# Altium PCB PCB1.PcbDoc
Units mil, origin at the board's own origin, x right, y up, seen from the top; angles counter-clockwise.
Board outline 6000 x 4000 mil, 2 copper layers (Top Layer, Bottom Layer); 50 components, 26 nets, 240 pads, 0 vias.
Unrouted connection lines stored in the file: 123.
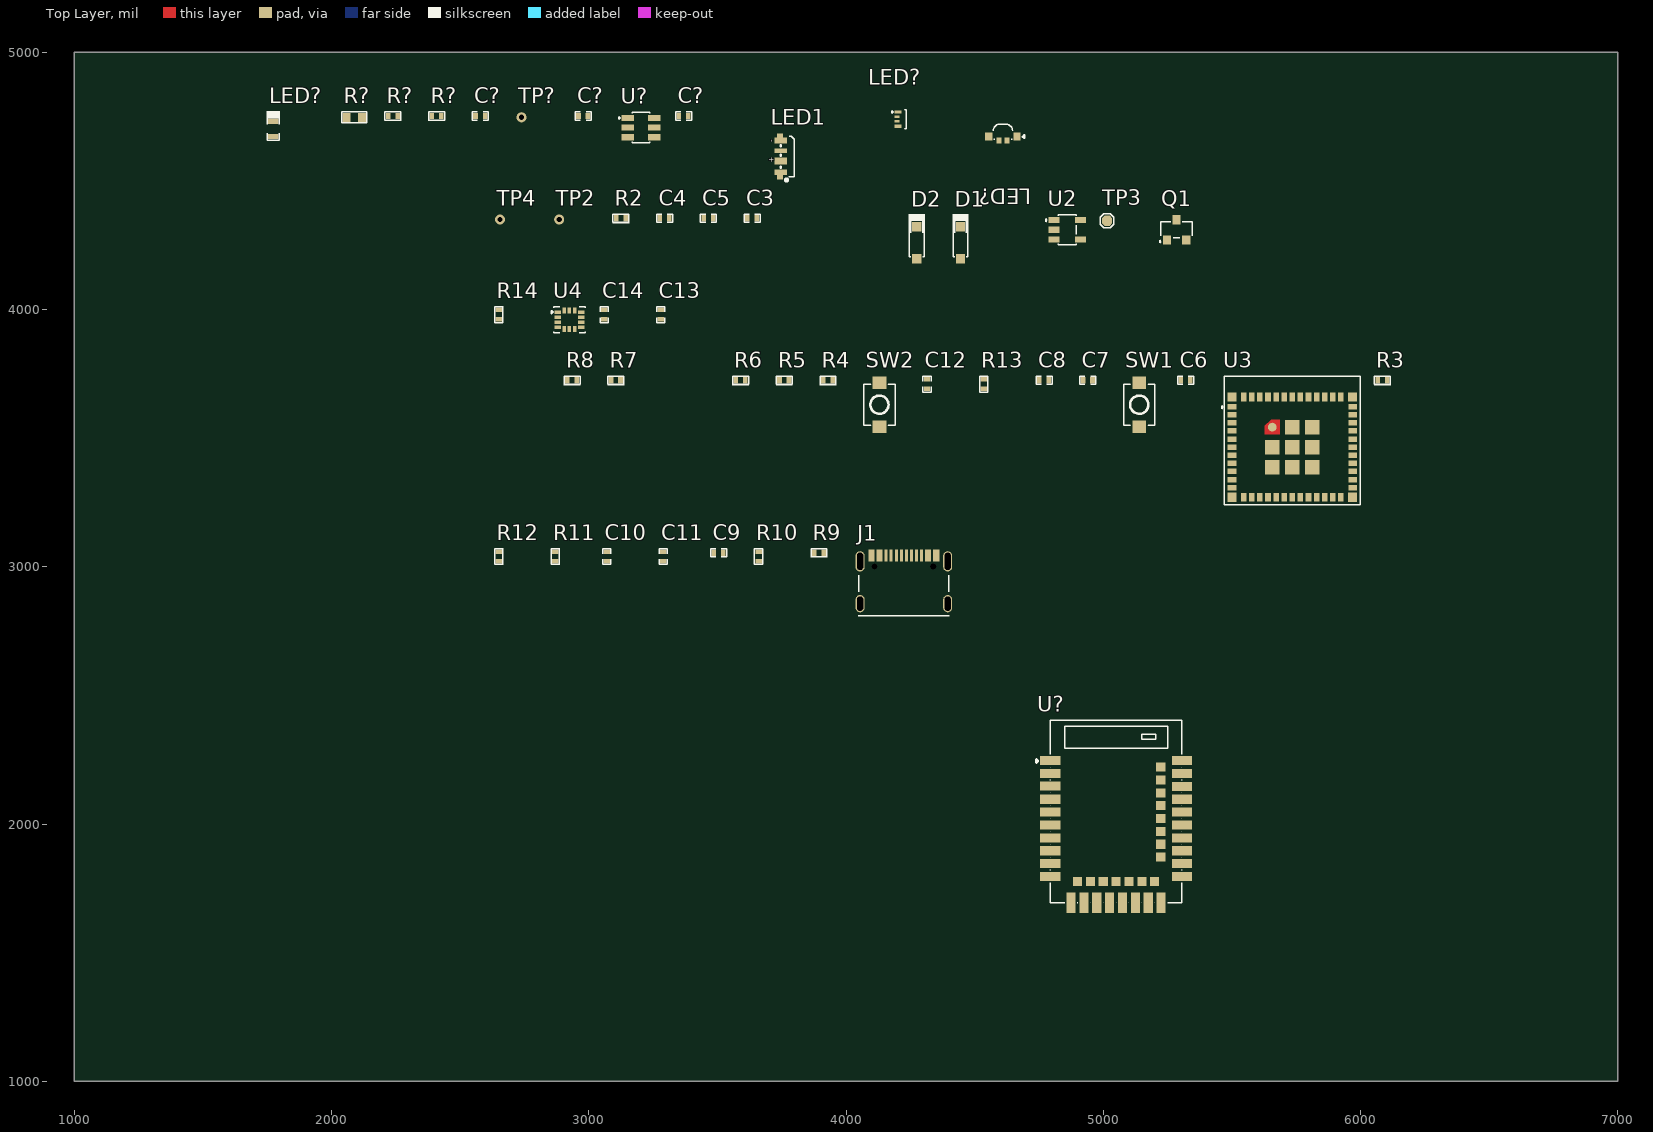
[diagram p0: Top Layer view]
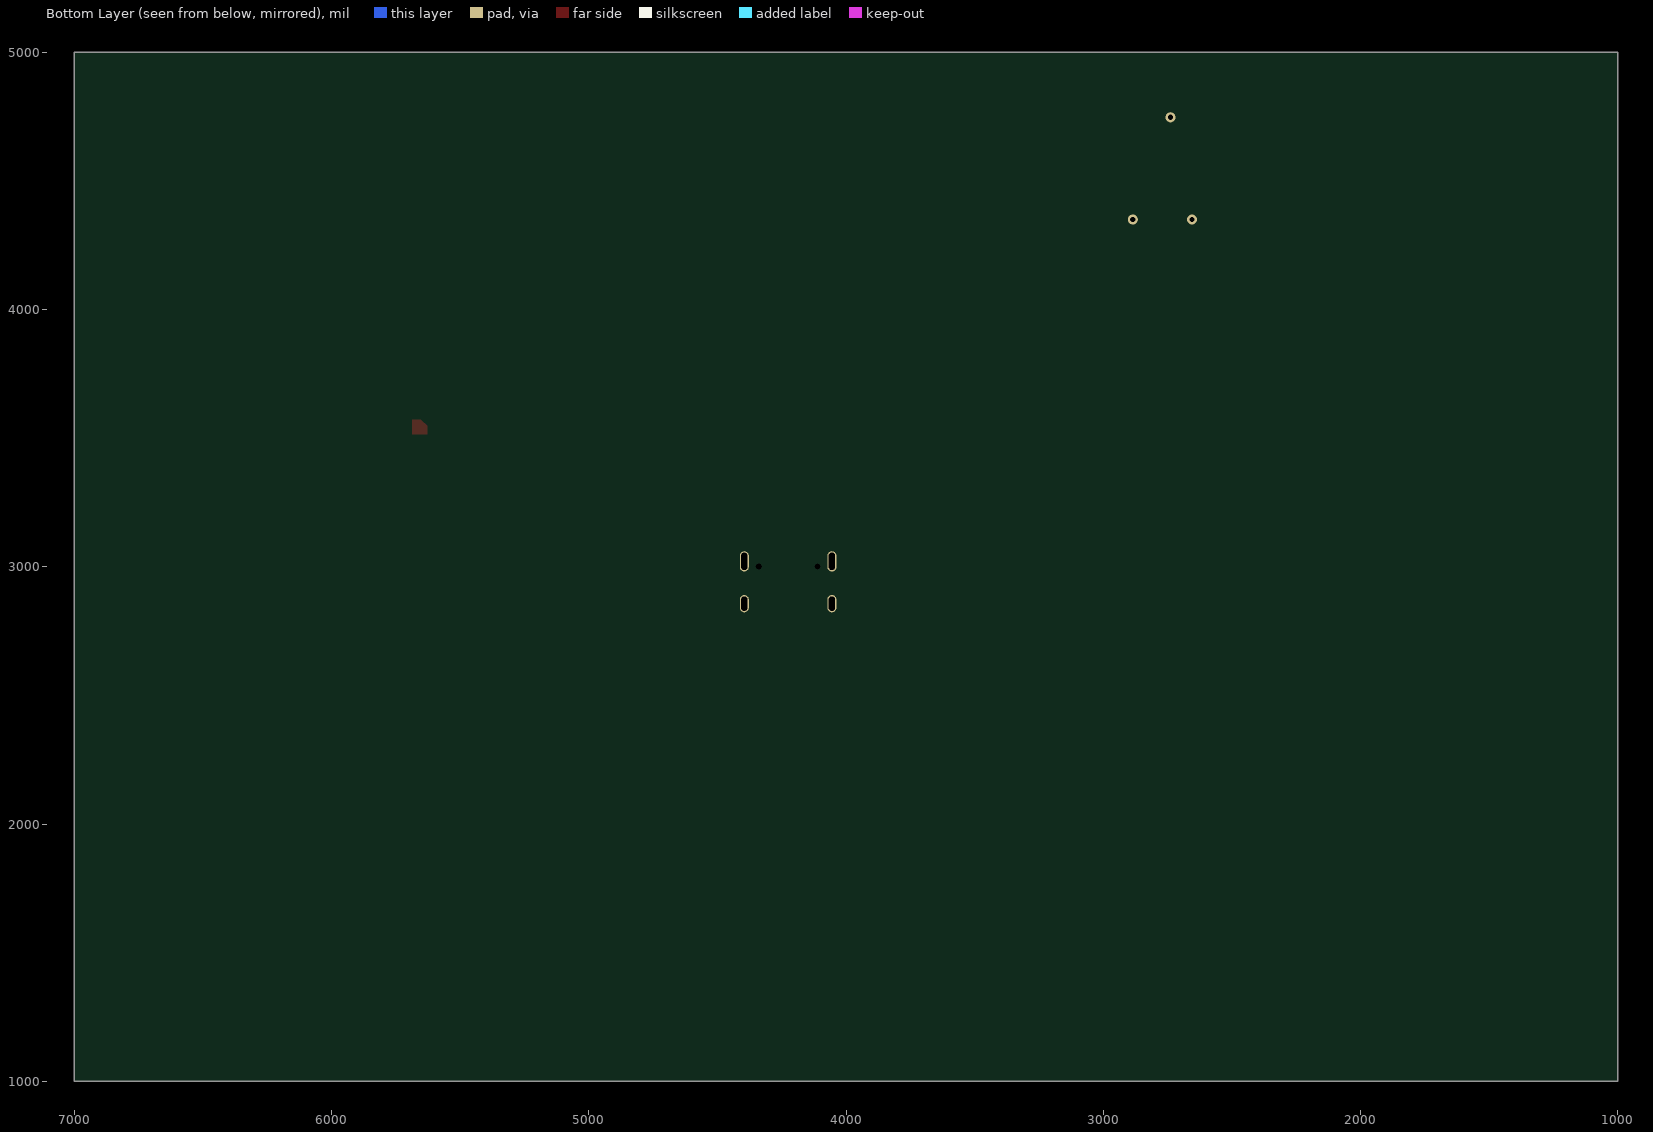
[diagram p1: Bottom Layer view, seen from below]

## Layer stack, top to bottom
Top Solder: solder mask 0.4, Solder Resist, Dk 3.5
Top Layer: signal copper 1.4
Dielectric 1: dielectric 12.6, FR-4, Dk 4.8
Bottom Layer: signal copper 1.4
Bottom Solder: solder mask 0.4, Solder Resist, Dk 3.5

## Board outline
1000,1000 7000,1000 7000,5000 1000,5000

## Design rules (kind name [scope] priority, off if disabled: settings)
Clearance [All] p1: gap=10 ignorepadtopadclearanceinfootprint=FALSE except(0: Arc-Hole Track-Hole SMDPad-Hole THPad-Hole Via-Hole Fill-Hole Poly-Hole Region-Hole Text-Hole)
DiffPairsRouting [All] p1: maxlimit=10 minlimit=10 mostfreqgap=10 toplayer_minwidth=15 toplayer_maxwidth=15 toplayer_prefwidth=15 bottomlayer_minwidth=15 bottomlayer_maxwidth=15 bottomlayer_prefwidth=15 maxuncoupledlength=500
MatchedLengths "Schematic Matched Net Lengths" [InNetClass('USB_PROGRAM')] p1: tolerance=50 checknetsindiffpair=TRUE checkdiffpairvsdiffpair=FALSE checkxsignals=FALSE checkothers=FALSE
MaxMinImpedance "Schematic Impedance Constraint" [InNetClass('USB_PROGRAM')] p1: minimum=85.00 maximum=90.00
PolygonConnect [All] p1: connectstyle=Relief reliefconductorwidth=10 reliefentries=4 polygonreliefangle="90 Angle" airgapwidth=10
RoutingVias [All] p1: holewidth=28 width=50 viastyle="Through Hole" minholewidth=28 minwidth=50 maxholewidth=28 maxwidth=50
SolderMaskExpansion [All] p1: expansion=4 istentingtop=FALSE
Width [All] p1: maxlimit=10 minlimit=10 preferedwidth=10
29 further rules are at their usual default settings.

## Classes and differential pairs
differential pair class USB_PROGRAM_LINES: USB_D
net class USB_PROGRAM: USB_D_N USB_D_P
component class IMU_Sheet: C13 C14 R14 U4
component class Controller_Sheet: C6 C7 C8 C12 LED1 LED? R3 R4 R5 R6 R7 R8 R13 SW1 SW2 U3 U?
component class Connector_Sheet: C9 C10 C11 J1 R9 R10 R11 R12
component class Power_Sheet: C3 C4 C5 C? D1 D2 LED? Q1 R2 R? TP2 TP3 TP4 TP? U2 U?
differential pair USB_D: +USB_D_P -USB_D_N

## Components (designator, comment, footprint, x,y, rotation, side; value= is the part's Value field where it differs from the comment)
C3 "1uF" Cap-0402 3635,4355 r0 top
C4 "1uF" Cap-0402 3295,4355 r0 top
C5 "10uF" Cap-0402 3465,4355 r0 top
C6 "1uF" Cap-0402 5320,3725 r0 top
C7 "100nF" Cap-0402 4940,3725 r0 top
C8 "10uF" Cap-0402 4770,3725 r0 top
C9 "10uF" Cap-0402 3505,3055 r0 top
C10 "22PF" Cap-0402 3070,3040 r90 top value=22pF
C11 "22PF" Cap-0402 3290,3040 r90 top value=22pF
C12 "1uF" Cap-0402 4315,3710 r90 top
C13 "1uF" Cap-0402 3280,3980 r90 top
C14 "100nF" Cap-0402 3060,3980 r90 top
C? "2.2uF" Cap-0402 2578.43,4752.4 r0 top
C? "10uF" Cap-0402 2978.43,4752.4 r0 top
C? "1uF" Cap-0402 3368.43,4752.4 r0 top
D1 "1N5819HW-7-F" SOD-123 4445,4260 r90 top
D2 "1N5819HW-7-F" SOD-123 4275,4260 r90 top
J1 "TYPE-C-31-M-12" TYPE-C-31-M-12_ 4225,2950 r0 top
LED1 "SK6812SIDE-A" SK6812SIDE-A 3745,4595 r90 top
LED? "150060GS75000" LED-0603 1773.43,4702.4 r90 top
LED? "IN-S63TBS5R5G5B" IN-S63TBS5R5G5B 4200,4740 r0 top
LED? "MHS110FRGBCT" MHS110FRGBCT 4610,4665 r0 top
Q1 "SI2301CDS-T1-BE3" SOT-23 5285,4310 r0 top
R2 "100K" Res-0402 3125,4355 r0 top
R3 "10K" Res-0402 6085,3725 r0 top value=10kR
R4 "10K" Res-0402 3930,3725 r0 top value=10kR
R5 "10K" Res-0402 3760,3725 r0 top value=10kR
R6 "10K" Res-0402 3590,3725 r0 top value=10kR
R7 "56K" Res-0402 3105,3725 r0 top
R8 "200K" Res-0402 2935,3725 r0 top
R9 "0R" Res-0402 3895,3055 r0 top
R10 "0R" Res-0402 3660,3040 r90 top
R11 "5.1K" Res-0402 2870,3040 r90 top
R12 "5.1K" Res-0402 2650,3040 r90 top
R13 "10K" Res-0402 4535,3710 r90 top value=10kR
R14 "10K" Res-0402 2650,3980 r90 top value=10kR
R? "100R" Res-0603 2088.43,4747.4 r0 top
R? "21k" Res-0402 2238.43,4752.4 r0 top value=21kR
R? "10K" Res-0402 2408.43,4752.4 r0 top value=10kR
SW1 "TS-1088-AR02016" TS-1088-AR02016 5140,3630 r90 top
SW2 "TS-1088-AR02016" TS-1088-AR02016 4130,3630 r90 top
TP2 "0.5mm Test Pad" "0.5mm Test Pad" 2885,4350 r90 top
TP3 "TEST POINT 0.5mm Dia" "Test-point - 0.5mm" 5015,4345 r90 top
TP4 "0.5mm Test Pad" "0.5mm Test Pad" 2655,4350 r90 top
TP? "0.5mm Test Pad" "0.5mm Test Pad" 2738.43,4747.4 r90 top
U2 "XC6210B332MR" Sot-23-5 4860,4310 r0 top
U3 "ESP32-C3-MINI-1U-H4" ESP32-C3-MINI-1U-H4. 5735,3465 r0 top
U4 "LSM6DSV16XTR" "14-LGA (2.5x3)" 2925,3960 r0 top
U? "E73-2G4M08S1C" E73-2G4M08S1C 5050,1970 r0 top
U? "BQ21040DBVR" SOT-23-6 3203.43,4707.4 r0 top

## Footprints (in the part's own frame and the unit in brackets; to place one, negate y for a bottom-side part, rotate by r counter-clockwise, add the part's x,y. Pads: shape width x height; smd on the part's side, far side on the other; paste and mask are expansions set on the pad)
"0.5mm Test Pad" [mm]
  round 1 hole 0.52: 1(0,0)
"14-LGA (2.5x3)" [mm]
  rect 0.61x0.35 smd mask+0.05: 1(-1.16,0.75) 2(-1.16,0.25) 3(-1.16,-0.25) 4(-1.16,-0.75) 8(1.16,-0.75) 9(1.16,-0.25) 10(1.16,0.25) 11(1.16,0.75)
  rect 0.35x0.61 smd mask+0.05: 5(-0.5,-0.91) 6(0,-0.91) 7(0.5,-0.91) 12(0.5,0.91) 13(0,0.91) 14(-0.5,0.91)
  silkscreen extent -1.78,-1.3 1.55,1.3, body extent -1.5,-1.25 1.5,1.25, height 0.86
Cap-0402 [mil]
  rect 18x25 smd mask+2.36: 1(-18.5,0) 2(18.5,0)
  silkscreen extent -31,-16 31,16, body extent -20,-10 20,10, height 19
E73-2G4M08S1C [mm]
  rect 2x0.9 smd paste+0 mask+0.05: 1(-6.505,7.015) 2(-6.505,5.745) 3(-6.5,4.5) 4(-6.505,3.205) 5(-6.505,1.935) 6(-6.505,0.665) 7(-6.505,-0.605) 8(-6.505,-1.875) 9(-6.505,-3.145) 10(-6.505,-4.415) 26(6.505,-4.415) 27(6.505,-3.145) 29(6.505,-1.875) 31(6.505,-0.605) 33(6.505,0.665) 35(6.505,1.935) 37(6.505,3.205) 39(6.505,4.475) 41(6.505,5.745) 43(6.505,7.015)
  rect 0.9x2 smd paste+0 mask+0.05: 11(-4.445,-7.015) 13(-3.175,-7.015) 15(-1.905,-7.015) 17(-0.635,-7.015) 19(0.635,-7.015) 21(1.905,-7.015) 23(3.175,-7.015) 25(4.445,-7.015)
  rect 0.9x0.9 smd paste+0 mask+0.05: 12(-3.81,-4.915) 14(-2.54,-4.915) 16(-1.27,-4.915) 18(0,-4.915) 20(1.27,-4.915) 22(2.54,-4.915) 24(3.81,-4.915) 28(4.405,-2.51) 30(4.405,-1.24) 32(4.405,0.03) 34(4.405,1.3) 36(4.405,2.57) 38(4.405,3.84) 40(4.405,5.11) 42(4.405,6.38)
  silkscreen extent -7.87,-7 6.5,11, body extent -6.5,-7.01 6.5,10.99, height 3
ESP32-C3-MINI-1U-H4. [mm]
  rect 0.85x0.55 smd paste+0 mask+0.05: 1(-5.95,4) 2(-5.95,3.2) 3(-5.95,2.4) 4(-5.95,1.6) 5(-5.95,0.8) 6(-5.95,0) 7(-5.95,-0.8) 8(-5.95,-1.6) 9(-5.95,-2.4) 10(-5.95,-3.2) 11(-5.95,-4) 25(5.95,-4) 26(5.95,-3.2) 27(5.95,-2.4) 28(5.95,-1.6) 29(5.95,-0.8) 30(5.95,0) 31(5.95,0.8) 32(5.95,1.6) 33(5.95,2.4) 34(5.95,3.2) 35(5.95,4)
  rect 0.55x0.85 smd paste+0 mask+0.05: 12(-4.8,-4.95) 13(-4,-4.95) 14(-3.2,-4.95) 15(-2.4,-4.95) 16(-1.6,-4.95) 17(-0.8,-4.95) 18(0,-4.95) 19(0.8,-4.95) 20(1.6,-4.95) 21(2.4,-4.95) 22(3.2,-4.95) 23(4,-4.95) 24(4.8,-4.95) 36(4.8,4.95) 37(4,4.95) 38(3.2,4.95) 39(2.4,4.95) 40(1.6,4.95) 41(0.8,4.95) 42(0,4.95) 43(-0.8,4.95) 44(-1.6,4.95) 45(-2.4,4.95) 46(-3.2,4.95) 47(-4,4.95) 48(-4.8,4.95)
  rect 1.45x1.45 smd paste+0 mask+0.05: 49(0,0) 54(-1.975,0) 56(0,1.975) 57(1.975,1.975) 58(1.975,0) 59(-1.975,-1.975) 60(0,-1.975) 61(1.975,-1.975)
  rect 0.9x0.9 smd paste+0 mask+0.05: 50(5.95,4.95) 51(5.95,-4.95) 52(-5.95,-4.95) 53(-5.95,4.95)
  round 0.87 smd: 55(-1.975,1.975)
  Top Layer region: -2.7,2.1 -2.1,2.7 -1.25,2.7 -1.25,1.25 -2.7,1.25 -2.7,2.1
  silkscreen extent -6.98,-5.7 6.7,7, body extent -6.6,-5.59 6.6,6.91, height 2.4
IN-S63TBS5R5G5B [mil]
  rect 28x12 smd mask+2.76: 1(1.97,27.56) 4(1.97,-27.56)
  rect 20x10 smd mask+2.76: 2(-1.97,8.86) 3(-1.97,-8.86)
  silkscreen extent -22,-36 35,36
LED-0603 [mm]
  rect 0.5x1 smd: 1(-0.75,0) 2(0.75,0)
  silkscreen extent -1.12,-0.66 1.75,0.66, body extent -0.82,-0.37 0.82,0.36, height 0.68
MHS110FRGBCT [mm]
  rect 0.7x0.8 smd: 1(1.4,0.2) 4(-1.4,0.2)
  rect 0.5x0.55 smd: 2(0.4,-0.2) 3(-0.4,-0.2)
  silkscreen extent -0.97,-0.1 2.11,1.43, body extent -1.6,-0.05 1.6,1.44, height 1.01
Res-0402 [mil]
  rect 18x25 smd mask+2.17: 1(-18.5,0) 2(18.5,0)
  silkscreen extent -32,-17 32,16, body extent -23,-11 23,11, height 16
Res-0603 [mil]
  rect 30x35 smd: 1(-30,0) 2(30,0)
  silkscreen extent -48,-21 48,21, body extent -31,-17 31,17, height 18
SK6812SIDE-A [mm] "SMD-4P,1.6x4mm Light Emitting Diodes (LED) ROHS"
  rect 0.45x0.55 smd: 1(-2.06,0.038) 4(2.06,0.038)
  rect 0.55x1.2 smd: 1(-1.575,-0.038) 4(1.575,-0.038)
  rect 0.7x1.2 smd: 2(-0.45,-0.038)
  rect 0.45x1.2 smd: 3(0.575,-0.038)
  silkscreen extent -2.46,-1.38 2,-0.04, body extent -2.04,-1.34 1.96,0.26, height 2
SOD-123 [mm]
  rect 0.95x0.9 smd: 1(-1.575,0) 2(1.575,0)
  silkscreen extent -1.37,-0.8 2.82,0.8, body extent -1.82,-0.78 1.83,0.78, height 1.5
SOT-23 [mm] "TRANS NPN 40V 0.6A SOT23"
  rect 0.82x0.92 smd: 1(-0.95,-1) 2(0.95,-1) 3(0,1)
  silkscreen extent -1.68,-1.3 1.55,0.81, body extent -1.5,-1.25 1.5,1.25, height 1.05
Sot-23-5 [mm]
  rect 1.1x0.6 smd: 1(-1.3,0.95) 2(-1.3,0) 3(-1.3,-0.95) 4(1.3,-0.95) 5(1.3,0.95)
  silkscreen extent -2.13,-1.5 0.88,1.5, body extent -1.4,-1.45 1.4,1.45, height 1.45
SOT-23-6 [mm]
  rect 1.22x0.62 smd: 1(-1.31,0.95) 2(-1.31,0) 3(-1.31,-0.95) 4(1.31,-0.95) 5(1.31,0) 6(1.31,0.95)
  silkscreen extent -2.18,-1.52 0.86,1.52, body extent -1.5,-1.5 1.5,1.5, height 1.47
"Test-point - 0.5mm" [mm]
  oct 1x1 smd: 1(0,0)
  silkscreen extent -0.68,-0.68 0.68,0.68
TS-1088-AR02016 [mm]
  rect 1.23x1.36 smd: 1(-2.185,0) 2(2.185,0)
  silkscreen extent -2.03,-1.54 2.03,1.54, body extent -2.4,-1.45 2.4,1.45, height 1.95
TYPE-C-31-M-12_ [mm]
  rect 0.6x1.2 smd: A1/B12(-3.2,2.375) A4/B9(-2.4,2.375) B1/A12(3.2,2.375) B4/A9(2.4,2.375)
  rect 0.3x1.2 smd: A5(-1.25,2.375) A6(-0.25,2.375) A7(0.25,2.375) A8(1.25,2.375) B5(1.75,2.375) B6(0.75,2.375) B7(-0.75,2.375) B8(-1.75,2.375)
  round 0 hole 0.62 unplated: MH(-2.89,1.305) MH(2.89,1.305)
  oval 0.9x2 hole 0.6 slot 1.7 at 90 deg: S1(4.325,1.805) S4(-4.325,1.805)
  oval 0.9x1.7 hole 0.6 slot 1.4 at 90 deg: S2(4.325,-2.375) S3(-4.325,-2.375)
  silkscreen extent -4.5,-3.57 4.5,0.44, body extent -4.47,-5.01 4.47,2.89, height 3.31

## Part data
C3 C4 C6 C12 C13 C?: library part GRM155C71C105KE11D, "CAP CER 1UF 16V X7S 0402", Case/Package=343Case, Dielectric=1542DielectricType, LCSC Part Number=C576449, Manufacturer=Murata, Max Operating Temperature=125°C, Min Operating Temperature=-55°C, Tolerance=10%, Voltage Rating=16V, Height=600um, Item Type=Capacitors, Length=1mm, Manufacturer Part Number=GRM155C71C105KE11D, Material=4241ConductorMaterial, Pricing="1=0.11, 10=0.041, 50=0.041, 100=0.026, 1000=0.023, 10000=0.016 (USD)", RoHS=No, Stock=16102, Supplier=Mouser, Thickness=500um, Voltage Rating (DC)=16V, Width=500um
C5 C8 C9 C?: library part CL05A106MP5NUNC, "CAP CER 10UF 10V X5R 0402", Case Code (Imperial)=0402, Case Code (Metric)=1005, Dielectric=X5R, LCSC Part Number=C315248, Manufacturer=Samsung, Max Operating Temperature=85°C, Min Operating Temperature=-55°C, Package Quantity=1, Tolerance=20%, Voltage Rating=10V, Capacitance=10uF, Case/Package=0402, Category="Ceramic Capacitors", ComponentLink1Description=https://datasheet.ciiva.com/25721/cl05a106mp5nunc-25721584.pdf?src-supplier=Digi-Key, ComponentLink1URL=https://datasheet.ciiva.com/25721/cl05a106mp5nunc-25721584.pdf?src-supplier=Digi-Key, ComponentLink2Description=https://datasheet.ciiva.com/26838/getdatasheetpartid-745310-26838170.pdf?src-supplier=Verical, ComponentLink2URL=https://datasheet.ciiva.com/26838/getdatasheetpartid-745310-26838170.pdf?src-supplier=Verical, Construction=Flat, Contact Plating=Tin, Depth=0.5mm, Item Type=Capacitor, Lead Free="Lead Free", Length=1mm, Manufacturer Part Number=CL05A106MP5NUNC, Mount="Surface Mount", Packaging="Tape and Reel", Pricing 1="10000=0.02537 (USD)", Radiation Hardening=No, RoHS=Yes, RoHS Compliant=Yes, Series=CL, Stock 1=1729850, Supplier 1=Avnet, Supplier Part Number 1=CL05A106MP5NUNC, Termination=Wraparound, Thickness=0.028inch, Width=0.02inch
C7 C14: library part CC0402KRX5R8BB104, "CAP CER 0.1UF 25V X5R 0402", Case Code (Imperial)=0402, Case Code (Metric)=1005, Dielectric=X5R, LCSC Part Number=C106256, Manufacturer=Yageo, Max Operating Temperature=85°C, Min Operating Temperature=-55°C, Resistor Type=Ceramic, Supplier Part Number 1=311-1697-1-ND, Tolerance=10%, Voltage Rating=25V, Capacitance=100nF, Case/Package=0402, Category="Ceramic Capacitors", ComponentLink1Description=http://www.mouser.com/ds/2/447/UPY-GPHC_X5R_4V-to-50V_25-1131599.pdf?src-supplier=Mouser, ComponentLink1URL=http://www.mouser.com/ds/2/447/UPY-GPHC_X5R_4V-to-50V_25-1131599.pdf?src-supplier=Mouser, ComponentLink2Description=http://www.yageo.com/documents/recent/UPY-GPHC_X5R_4V-to-50V-16.pdf?src-supplier=Future+Electronics, ComponentLink2URL=http://www.yageo.com/documents/recent/UPY-GPHC_X5R_4V-to-50V-16.pdf?src-supplier=Future+Electronics, ComponentLink3Description=http://www.yageo.com/documents/recent/UPY-GPHC_X5R_4V-to-50V_25.pdf?src-supplier=Digi-Key, ComponentLink3URL=http://www.yageo.com/documents/recent/UPY-GPHC_X5R_4V-to-50V_25.pdf?src-supplier=Digi-Key, Depth=0.5mm, Halogen Free="Halogen Free", Item Type=Capacitor, Lead Free="Lead Free", Length=0.039inch, Manufacturer Part Number=CC0402KRX5R8BB104, Mount="Surface Mount", Packaging="Tape and Reel", Pricing 1="1=0.10000, 10=0.03800, 50=0.02100, 100=0.01710, 500=0.01224, 1000=0.00961, 2500=0.00874, 5000=0.00804 (USD)", RoHS=Yes, RoHS Compliant=Yes, Series=CC, Stock 1=4598218, Supplier 1=Digi-Key, Thickness=0.022inch, Voltage Rating (DC)=25V, Width=0.02inch
C10 C11: library part CC0402JRNPO9BN220, "CAP CER 22PF 50V C0G/NPO 0402", Case Code (Imperial)=0402, Case Code (Metric)=1005, Dielectric=C0G, Dielectric Material=Ceramic, Insulation Resistance=100GR, LCSC Part Number=C106203, Manufacturer=Yageo, Max Operating Temperature=125°C, Min Operating Temperature=-55°C, Package Quantity=1, Supplier Part Number 1=9105957, Temperature Coefficient=30ppm/°C, Tolerance=5%, Voltage=50V, Case/Package=0402, Category="Ceramic Capacitors", ComponentLink1Description=https://datasheet.ciiva.com/5789/1443161-5789509.pdf?src-supplier=Farnell, ComponentLink1URL=https://datasheet.ciiva.com/5789/1443161-5789509.pdf?src-supplier=Farnell, ComponentLink2Description=https://datasheet.ciiva.com/8033/1443161-8033606.pdf?src-supplier=Element14, ComponentLink2URL=https://datasheet.ciiva.com/8033/1443161-8033606.pdf?src-supplier=Element14, ComponentLink3Description=https://datasheet.ciiva.com/7656/1132289-7656615.pdf?src-supplier=Element14, ComponentLink3URL=https://datasheet.ciiva.com/7656/1132289-7656615.pdf?src-supplier=Element14, ComponentLink4Description=https://datasheet.ciiva.com/8033/1443161-8033607.pdf?src-supplier=Element14, ComponentLink4URL=https://datasheet.ciiva.com/8033/1443161-8033607.pdf?src-supplier=Element14, ComponentLink5Description=https://datasheet.ciiva.com/8033/1443161-8033605.pdf?src-supplier=Element14, ComponentLink5URL=https://datasheet.ciiva.com/8033/1443161-8033605.pdf?src-supplier=Element14, ComponentLink6Description=https://datasheet.ciiva.com/143/mlccorderingcode-143987.pdf?src-supplier=Digi-Key, ComponentLink6URL=https://datasheet.ciiva.com/143/mlccorderingcode-143987.pdf?src-supplier=Digi-Key, ComponentLink7Description=https://datasheet.ciiva.com/143/mlccorderingcode-143986.pdf?src-supplier=Digi-Key, ComponentLink7URL=https://datasheet.ciiva.com/143/mlccorderingcode-143986.pdf?src-supplier=Digi-Key, ComponentLink8Description=https://datasheet.ciiva.com/143/mlccorderingcode-143988.pdf?src-supplier=Digi-Key, ComponentLink8URL=https://datasheet.ciiva.com/143/mlccorderingcode-143988.pdf?src-supplier=Digi-Key, ComponentLink9Description=https://datasheet.ciiva.com/5425/upy-gp-np0-16v-to-50v-8-5425483.pdf?src-supplier=Mouser, ComponentLink9URL=https://datasheet.ciiva.com/5425/upy-gp-np0-16v-to-50v-8-5425483.pdf?src-supplier=Mouser, ComponentLink10Description=https://datasheet.ciiva.com/15189/getdatasheetpartid-370074-15189117.pdf?src-supplier=Verical, ComponentLink10URL=https://datasheet.ciiva.com/15189/getdatasheetpartid-370074-15189117.pdf?src-supplier=Verical, Depth=0.5mm, Height=0.5mm, Item Type=Capacitor, Lead Free="Lead Free", Length=1mm, Manufacturer Part Number=CC0402JRNPO9BN220, Mounting Technology="Surface Mount", Packaging="Tape and Reel", Pins=2, Pricing 1="10000=0.00220, 40000=0.00210, 150000=0.00200, 400000=0.00190, 1000000=0.00180 (USD)", Radiation Hardening=No, Reach SVHC Compliant=Yes, Resistor Type=Ceramic, RoHS=Yes, RoHS Compliant=Yes, Series=CC, Stock 1=200000, Supplier 1="Future Electronics", Termination=SMD/SMT, Thickness=0.022inch, Voltage Rating=50V, Voltage Rating (DC)=50V, Width=0.02inch
C?: library part GRM155R61C225KE11D, "CAP CER 2.2UF 16V X5R 0402", Case Code (Imperial)=0402, Case Code (Metric)=1005, LCSC Part Number=C88944, Manufacturer=Murata, Max Operating Temperature=85°C, Min Operating Temperature=-55°C, Tolerance=10%, Voltage Rating=16V, Case/Package=0402, ComponentLink1Description=http://www.mouser.com/ds/2/281/c02e-2905.pdf?src-supplier=Mouser, ComponentLink1URL=http://www.mouser.com/ds/2/281/c02e-2905.pdf?src-supplier=Mouser, ComponentLink2Description=https://datasheet.octopart.com/GRM155R61C225KE11D-Murata-datasheet-149522998.pdf?src-supplier=Newark, ComponentLink2URL=https://datasheet.octopart.com/GRM155R61C225KE11D-Murata-datasheet-149522998.pdf?src-supplier=Newark, ComponentLink3Description=https://datasheet.octopart.com/GRM155R61C225KE11D-Murata-datasheet-66001083.pdf?src-supplier=Future+Electronics, ComponentLink3URL=https://datasheet.octopart.com/GRM155R61C225KE11D-Murata-datasheet-66001083.pdf?src-supplier=Future+Electronics, ComponentLink4Description=https://search.murata.co.jp/Ceramy/image/img/A01X/G101/ENG/GRM155R61C225KE11-01.pdf?src-supplier=Digikey, ComponentLink4URL=https://search.murata.co.jp/Ceramy/image/img/A01X/G101/ENG/GRM155R61C225KE11-01.pdf?src-supplier=Digikey, ComponentLink5Description=https://datasheet.octopart.com/GRM155R61C225KE11D-Murata-datasheet-165579666.pdf?src-supplier=TME, ComponentLink5URL=https://datasheet.octopart.com/GRM155R61C225KE11D-Murata-datasheet-165579666.pdf?src-supplier=TME, Height=0.3mm, Item Type=Capacitors, Lead Free="Lead Free", Length=0.039inch, Manufacturer Part Number=GRM155R61C225KE11D, Material=Ceramic, Mounting Technology="Surface Mount", Packaging="Cut Tape", Pricing="10000=0.0294, 20000=0.0289, 30000=0.0287, 40000=0.0285, 50000=0.0279 (USD)", RoHS=Yes, RoHS Compliant=Yes, Series=GRM, Stock=80000, Supplier="Future Electronics", Thickness=0.022inch, Voltage Rating (DC)=16V, Width=0.02inch
D1 D2: "DIODE SCHOTTKY 40V 1A SOD123", Average Rectified Current=1A, Capacitance=110pF, Case/Package=SOD-123-2, Forward Voltage=450mV, LCSC Part Number=C82544, Manufacturer=Diodes, Max Forward Surge Current (Ifsm)=25A, Max Operating Temperature=125°C, Max Power Dissipation=450mW, Max Repetitive Reverse Voltage (Vrrm)=40V, Max Reverse Current=50uA, Min Operating Temperature=-65°C, Package Quantity=3000, Supplier Part Number 1=1N5819HW-FDICT-ND, Category="Schottky Diodes", ComponentLink1Description=https://datasheet.ciiva.com/16303/ds30217-16303296.pdf?src-supplier=Future+Electronics, ComponentLink1URL=https://datasheet.ciiva.com/16303/ds30217-16303296.pdf?src-supplier=Future+Electronics, ComponentLink2Description=https://datasheet.ciiva.com/27092/1538419-27092484.pdf?src-supplier=Jameco, ComponentLink2URL=https://datasheet.ciiva.com/27092/1538419-27092484.pdf?src-supplier=Jameco, ComponentLink3Description=https://datasheet.ciiva.com/912/ds30217-912801.pdf?src-supplier=Digi-Key, ComponentLink3URL=https://datasheet.ciiva.com/912/ds30217-912801.pdf?src-supplier=Digi-Key, ComponentLink4Description=https://datasheet.ciiva.com/1177/ds30217-1177089.pdf?src-supplier=Element14, ComponentLink4URL=https://datasheet.ciiva.com/1177/ds30217-1177089.pdf?src-supplier=Element14, ComponentLink5Description=https://datasheet.ciiva.com/912/ds30217-912802.pdf?src-supplier=Digi-Key, ComponentLink5URL=https://datasheet.ciiva.com/912/ds30217-912802.pdf?src-supplier=Digi-Key, ComponentLink6Description=https://datasheet.ciiva.com/912/ds30217-912803.pdf?src-supplier=Digi-Key, ComponentLink6URL=https://datasheet.ciiva.com/912/ds30217-912803.pdf?src-supplier=Digi-Key, ComponentLink7Description=https://datasheet.ciiva.com/8303/ds30217-8303132.pdf?src-supplier=Avnet, ComponentLink7URL=https://datasheet.ciiva.com/8303/ds30217-8303132.pdf?src-supplier=Avnet, ComponentLink8Description=https://datasheet.ciiva.com/25919/ds30217-25919644.pdf?src-supplier=Avnet+Europe, ComponentLink8URL=https://datasheet.ciiva.com/25919/ds30217-25919644.pdf?src-supplier=Avnet+Europe, Contact Plating=Tin,Matte, Current Rating=1A, Element Configuration=Single, Forward Current=1A, Height=1.25mm, Item Type=Diode, Lead Free="Lead Free", Length=2.85mm, Manufacturer Part Number=1N5819HW-7-F, Max Reverse Voltage (DC)=40V, Number of Pins=2, Output Current=1A, Packaging="Tape and Reel", Peak Non-Repetitive Surge Current=25A, Polarity=Standard, Pricing 1="1=0.46000, 10=0.34500, 100=0.19530, 500=0.12936, 1000=0.09918 (USD)", Radiation Hardening=No, REACH SVHC="No SVHC", RoHS=Yes, RoHS Compliant=Yes, Series=-, Supplier 1=Digi-Key, Termination=SMD/SMT, Voltage Rating (DC)=40V, Weight=0.000353oz, Width=1.7mm
J1: "5A 1 16P Female Type-C SMD USB Connectors ROHS", LCSC Part Number=C165948, Manufacturer="Korean Hroparts Elec", ComponentLink1Description=LCSC, ComponentLink1URL=https://www.lcsc.com/product-detail/USB-Connectors_Korean-Hroparts-Elec-TYPE-C-31-M-12_C165948.html, Item Type="USB Connector", Manufacturer Part Number=TYPE-C-31-M-12
LED1: "SMD-4P,1.6x4mm Light Emitting Diodes (LED) ROHS", LCSC Part Number=C5378721, Manufacturer="OPSCO Optoelectronics", Package=SMD-4P,1.6x4mm, ComponentLink1Description=LCSC, ComponentLink1URL=https://www.lcsc.com/product-detail/Light-Emitting-Diodes-LED_OPSCO-Optoelectronics-SK6812SIDE-A_C5378721.html, Item Type="Addressable RGB LED", Manufacturer Part Number=SK6812SIDE-A
LED?: "LED GREEN CLEAR 0603 SMD", Case Code (Imperial)=0603, Case Code (Metric)=1608, Color=Green, Forward Current=30mA, Forward Voltage=3.2V, LCSC Part Number=C5252984, Lens Color=Colorless, Manufacturer="Wurth Electronics", Max Operating Temperature=85°C, Max Reverse Voltage (DC)=5V, Min Operating Temperature=-40°C, Output Current=10uA, Package Quantity=1, Power Dissipation=105mW, Test Current=20mA, Case/Package=0603, ComponentLink1Description=https://datasheet.ciiva.com/29562/150060gs75000-29562868.pdf?src-supplier=Digikey, ComponentLink1URL=https://datasheet.ciiva.com/29562/150060gs75000-29562868.pdf?src-supplier=Digikey, ComponentLink2Description=https://datasheet.ciiva.com/29279/759427-da-01-en-chipled-0603-w-kl-gruen-150060gs75000-29279201.pdf?src-supplier=Conrad, ComponentLink2URL=https://datasheet.ciiva.com/29279/759427-da-01-en-chipled-0603-w-kl-gruen-150060gs75000-29279201.pdf?src-supplier=Conrad, ComponentLink3Description=https://datasheet.ciiva.com/29562/150060gs75000-29562869.pdf?src-supplier=Digikey, ComponentLink3URL=https://datasheet.ciiva.com/29562/150060gs75000-29562869.pdf?src-supplier=Digikey, ComponentLink4Description=https://datasheet.ciiva.com/29562/150060gs75000-29562870.pdf?src-supplier=Digikey, ComponentLink4URL=https://datasheet.ciiva.com/29562/150060gs75000-29562870.pdf?src-supplier=Digikey, Dominant Wavelength=520nm, Height=0.8mm, Item Type=LEDs, Lead Free="Lead Free", Length=1.6mm, Lens Size=0.7mm, Lens Style=Clear,Flat,Rectangular, Lens Transparency=Clear, Luminous Intensity=430mcd, Manufacturer Part Number=150060GS75000, Mounting Technology="Surface Mount", Packaging="Cut Tape", Reach SVHC Compliant=Unknown, Reverse Voltage=5V, RoHS=Yes, RoHS Compliant=Yes, Series=WL-SMCW, Stock=14000, Supplier=Rs, Viewing Angle=140°, Wavelength=520nm, Width=0.8mm
LED?: "LED RGB CLEAR 0603 SMD R/A", Manufacturer=Inolux, Supplier Part Number=743-IN-S63TBS5R5G5B, Category=LEDs, Item Type=LED, Manufacturer Part Number=IN-S63TBS5R5G5B, Pricing="1=0.5, 10=0.328, 50=0.328, 100=0.218, 1000=0.152, 10000=0.141 (USD)", RoHS=No, Stock=12751, Supplier=Mouser
LED?: "Colorless transparence Side stickers -40℃~+85℃ Common anode RGB 120° 60mW SMD,1.5x3.2mm Light Emitting Diodes (LED) ROHS", LCSC Part Number=C496820, Manufacturer=MEIHUA, Package=SMD,1.5x3.2mm, ComponentLink1Description=LCSC, ComponentLink1URL=https://www.lcsc.com/product-detail/Light-Emitting-Diodes-LED_MEIHUA-MHS110FRGBCT_C496820.html, Item Type="RGB LED", Manufacturer Part Number=MHS110FRGBCT
Q1: "Transistor MOSFET P-CH 20V 3.1A 3-Pin SOT-23", Continuous Drain Current (ID)=-2.3A, Drain to Source Breakdown Voltage=-20V, Drain to Source Resistance=90mR, Gate to Source Voltage (Vgs)=8V, Manufacturer=Vishay, Max Operating Temperature=150°C, Min Operating Temperature=-55°C, Power Dissipation=860mW, Supplier Part Number=742-SI2301CDS-T1-BE3CT-ND, Category=MOSFETs, Drain to Source Voltage (Vdss)=-20V, Height=1.12mm, Manufacturer Part Number=SI2301CDS-T1-BE3, Number of Channels=1NUMBER, Pricing="1=0.37, 10=0.289, 100=0.1734, 500=0.1606, 1000=0.1092 (USD)", RoHS=Yes, Stock=6842, Supplier=Digikey, Turn-Off Delay Time=30ns, Turn-On Delay Time=11ns
R2: library part RC0402FR-07100KL, "RES 100K OHM 1% 1/16W 0402", Case Code (Imperial)=0402, Case Code (Metric)=1005, LCSC Part Number=C60491, Manufacturer=Yageo, Max Operating Temperature=155°C, Max Power Dissipation=63mW, Min Operating Temperature=-55°C, Package Quantity=1, Resistance=100kR, Resistance Tolerance=1%, Resistor Type="Thick Film", Supplier Part Number 1=603-RC0402FR-07100KL, Temperature Coefficient=100ppm/°C, Voltage Rating=50V, Case/Package=0402, Category="Chip SMD Resistors", ComponentLink1Description=https://datasheet.ciiva.com/11819/0900766b80c66297-11819452.pdf?src-supplier=RSComponents, ComponentLink1URL=https://datasheet.ciiva.com/11819/0900766b80c66297-11819452.pdf?src-supplier=RSComponents, ComponentLink2Description=https://datasheet.ciiva.com/22747/1018594-22747509.pdf?src-supplier=Element14, ComponentLink2URL=https://datasheet.ciiva.com/22747/1018594-22747509.pdf?src-supplier=Element14, ComponentLink3Description=https://datasheet.ciiva.com/2453/pyu-r-int-thick-7-2453362.pdf?src-supplier=Digi-Key, ComponentLink3URL=https://datasheet.ciiva.com/2453/pyu-r-int-thick-7-2453362.pdf?src-supplier=Digi-Key, ComponentLink4Description=https://datasheet.ciiva.com/2453/pyu-r-int-thick-7-2453363.pdf?src-supplier=Digi-Key, ComponentLink4URL=https://datasheet.ciiva.com/2453/pyu-r-int-thick-7-2453363.pdf?src-supplier=Digi-Key, ComponentLink5Description=https://datasheet.ciiva.com/2453/pyu-r-int-thick-7-2453361.pdf?src-supplier=Digi-Key, ComponentLink5URL=https://datasheet.ciiva.com/2453/pyu-r-int-thick-7-2453361.pdf?src-supplier=Digi-Key, ComponentLink6Description=https://datasheet.ciiva.com/12667/pyu-rc0402-51-rohs-l-6-r-12667930.pdf?src-supplier=Mouser, ComponentLink6URL=https://datasheet.ciiva.com/12667/pyu-rc0402-51-rohs-l-6-r-12667930.pdf?src-supplier=Mouser, ComponentLink7Description=https://datasheet.ciiva.com/15189/getdatasheetpartid-323696-15189334.pdf?src-supplier=Verical, ComponentLink7URL=https://datasheet.ciiva.com/15189/getdatasheetpartid-323696-15189334.pdf?src-supplier=Verical, Construction=Rectangular, Depth=0.5mm, Features="Moisture Resistant", Height=0.016inch, Item Type=Resistor, Lead Free="Lead Free", Length=0.039inch, Manufacturer Part Number=RC0402FR-07100KL, Military Standard=Not, Number of Terminations=2, Packaging="Tape and Reel", Power Rating=63mW, Pricing 1="1=0.10000, 10=0.01200, 50=0.01200, 100=0.00500, 1000=0.00300, 2500=0.00200, 10000=0.00100 (USD)", REACH SVHC="No SVHC", RoHS=Yes, RoHS Compliant=Yes, Series=RC, Stock 1=7759549, Supplier 1=Mouser, Technology="THICK FILM", Termination=SMD/SMT, Tolerance=1%, Width=0.02inch, Working Voltage=50V
R3 R4 R5 R6 R13 R14 R?: library part RE0402DRE0710KL, "RES SMD 10K OHM 0.5% 1/16W 0402", Case/Package=0402, LCSC Part Number=C851874, Manufacturer=Yageo, Max Operating Temperature=155°C, Max Power Dissipation=63mW, Min Operating Temperature=-55°C, Supplier Part Number=8132697, Temperature Coefficient=50ppm/°C, Tolerance=0.5%, Category="Chip SMD Resistors", ComponentLink1Description=http://www.yageo.com/NewPortal/yageodocoutput?fileName=/pdf/R-Chip/PYu-RE_105_RoHS_L_6.pdf&src-supplier=Digi-Key, ComponentLink1URL=http://www.yageo.com/NewPortal/yageodocoutput?fileName=/pdf/R-Chip/PYu-RE_105_RoHS_L_6.pdf&src-supplier=Digi-Key, Features="Moisture Resistant", Height=0.015inch, Item Type=Resistor, Length=0.039inch, Manufacturer Part Number=RE0402DRE0710KL, Number of Terminations=2, Packaging="Tape and Reel", Pricing="10000=0.0059, 40000=0.0056, 150000=0.0053, 250000=0.0052, 500000=0.0049 (USD)", RoHS=Yes, RoHS Compliant=Yes, Series=RE, Stock=10000, Supplier="Future Electronics", Width=0.02inch
R7: library part RT0402BRD0756KL, "RES SMD 56K OHM 0.1% 1/16W 0402", LCSC Part Number=C852845, Manufacturer=Yageo, ComponentLink1Description=https://datasheet.ciiva.com/12721/pyu-rt-1-to-0-05-rohs-l-4-12721243.pdf?src-supplier=Mouser, ComponentLink1URL=https://datasheet.ciiva.com/12721/pyu-rt-1-to-0-05-rohs-l-4-12721243.pdf?src-supplier=Mouser, ComponentLink2Description=https://datasheet.ciiva.com/2582/pyu-rt-1-to-0-05-rohs-l-4-2582430.pdf?src-supplier=Digikey, ComponentLink2URL=https://datasheet.ciiva.com/2582/pyu-rt-1-to-0-05-rohs-l-4-2582430.pdf?src-supplier=Digikey, Item Type=Resistors, Manufacturer Part Number=RT0402BRD0756KL, Pricing="10000=0.0279 (USD)", RoHS=Yes, Stock=70000, Supplier="Arrow Electronics"
R8: library part RC0402DR-07200KL, "RES 200K OHM 0.5% 1/16W 0402", Case/Package=0402, LCSC Part Number=C138077, Manufacturer=Yageo, Max Operating Temperature=155°C, Max Power Dissipation=63mW, Min Operating Temperature=-55°C, Resistance=200kR, Resistor Type="Thick Film", Supplier Part Number 1=603-RC0402DR-07200KL, Temperature Coefficient=100ppm/°C, Tolerance=0.5%, Category="Chip SMD Resistors", ComponentLink1Description=http://www.yageo.com.tw/exep/pages/download/literatures/PYu-R_INT-thick_7.pdf?src-supplier=Digi-Key, ComponentLink1URL=http://www.yageo.com.tw/exep/pages/download/literatures/PYu-R_INT-thick_7.pdf?src-supplier=Digi-Key, Features="Moisture Resistant", Height=0.016inch, Length=0.039inch, Manufacturer Part Number=RC0402DR-07200KL, Number of Terminations=2, Packaging="Tape and Reel", Pricing 1="1=0.13000, 10=0.07000, 50=0.07000, 100=0.02900, 1000=0.01300, 10000=0.00700 (USD)", RoHS=Yes, Supplier 1=Mouser, Width=0.02inch
R9 R10: library part RCS04020000Z0ED, "RES SMD 0 OHM JUMPER 1/5W 0402", Case Code (Imperial)=0402, Case Code (Metric)=1005, LCSC Part Number=C844673, Manufacturer="Vishay Dale", Max Operating Temperature=155°C, Max Power Dissipation=200mW, Min Operating Temperature=-55°C, Resistance=0mR, Resistor Type="Thick Film", Supplier Part Number 1=541-2877-1-ND, Case/Package=0402, ComponentLink1Description=http://www.farnell.com/datasheets/2618474.pdf?src-supplier=Farnell, ComponentLink1URL=http://www.farnell.com/datasheets/2618474.pdf?src-supplier=Farnell, ComponentLink2Description=http://www.farnell.com/datasheets/2618474.pdf?src-supplier=Element14, ComponentLink2URL=http://www.farnell.com/datasheets/2618474.pdf?src-supplier=Element14, ComponentLink3Description=http://www.vishay.com/docs/20065/rcse3.pdf?src-supplier=Digi-Key, ComponentLink3URL=http://www.vishay.com/docs/20065/rcse3.pdf?src-supplier=Digi-Key, ComponentLink4Description=http://www.farnell.com/datasheets/2618474.pdf?src-supplier=Newark, ComponentLink4URL=http://www.farnell.com/datasheets/2618474.pdf?src-supplier=Newark, Features="Automotive AEC-Q200", Height=0.016inch, Item Type=Resistor, Length=0.039inch, Manufacturer Part Number=RCS04020000Z0ED, Number of Terminations=2, Packaging="Tape and Reel", Pricing 1="1=0.1, 10=0.083, 25=0.0576, 50=0.0448, 100=0.032, 250=0.02496, 500=0.01984, 1000=0.01408, 5000=0.01088 (USD)", RoHS Compliant=Yes, Stock 1=35470, Supplier 1=Digi-Key, Width=0.02inch
R11 R12: library part RC0402FR-075K1L, "RES 5.1K OHM 1% 1/16W 0402", Case Code (Imperial)=0402, Case Code (Metric)=1005, LCSC Part Number=C105872, Manufacturer=Yageo, Max Operating Temperature=155°C, Max Power Dissipation=63mW, Min Operating Temperature=-55°C, Package Quantity=1, Resistance=5.1kR, Resistance Tolerance=1%, Resistor Type="Thick Film", Temperature Coefficient=100ppm/°C, Voltage Rating=50V, Case/Package=0402, Category="Chip SMD Resistors", ComponentLink1Description=https://datasheet.ciiva.com/7983/1018594-7983519.pdf?src-supplier=Element14, ComponentLink1URL=https://datasheet.ciiva.com/7983/1018594-7983519.pdf?src-supplier=Element14, ComponentLink2Description=https://datasheet.ciiva.com/46394/1018594-46394936.pdf?src-supplier=Element14, ComponentLink2URL=https://datasheet.ciiva.com/46394/1018594-46394936.pdf?src-supplier=Element14, ComponentLink3Description=https://datasheet.ciiva.com/2453/pyu-r-int-thick-7-2453401.pdf?src-supplier=Digi-Key, ComponentLink3URL=https://datasheet.ciiva.com/2453/pyu-r-int-thick-7-2453401.pdf?src-supplier=Digi-Key, ComponentLink4Description=https://datasheet.ciiva.com/2453/pyu-r-int-thick-7-2453402.pdf?src-supplier=Digi-Key, ComponentLink4URL=https://datasheet.ciiva.com/2453/pyu-r-int-thick-7-2453402.pdf?src-supplier=Digi-Key, ComponentLink5Description=https://datasheet.ciiva.com/2453/pyu-r-int-thick-7-2453400.pdf?src-supplier=Digi-Key, ComponentLink5URL=https://datasheet.ciiva.com/2453/pyu-r-int-thick-7-2453400.pdf?src-supplier=Digi-Key, ComponentLink6Description=https://datasheet.ciiva.com/12558/pyu-rc0402-51-rohs-l-6-r-8721-12558460.pdf?src-supplier=Mouser, ComponentLink6URL=https://datasheet.ciiva.com/12558/pyu-rc0402-51-rohs-l-6-r-8721-12558460.pdf?src-supplier=Mouser, ComponentLink7Description=https://datasheet.ciiva.com/16744/pyu-rc0402-51-rohs-l-6-r-16744283.pdf?src-supplier=Future+Electronics, ComponentLink7URL=https://datasheet.ciiva.com/16744/pyu-rc0402-51-rohs-l-6-r-16744283.pdf?src-supplier=Future+Electronics, ComponentLink8Description=https://datasheet.ciiva.com/15189/getdatasheetpartid-323636-15189493.pdf?src-supplier=Verical, ComponentLink8URL=https://datasheet.ciiva.com/15189/getdatasheetpartid-323636-15189493.pdf?src-supplier=Verical, Construction=Rectangular, Depth=0.5mm, Features="Moisture Resistant", Height=0.016inch, Item Type=Resistor, Lead Free="Lead Free", Length=1mm, Manufacturer Part Number=RC0402FR-075K1L, Military Standard=Not, Number of Terminations=2, Packaging="Tape and Reel", Power Rating=63mW, Pricing 1="10000=0.00085 (USD)", RoHS=Yes, RoHS Compliant=Yes, Series=RC, Stock 1=65000, Supplier 1=Avnet, Supplier Part Number 1=RC0402FR-075K1L, Technology="THICK FILM", Termination=SMD/SMT, Tolerance=1%, Voltage Rating (DC)=50V, Width=0.02inch, Working Voltage=50V
R?: library part CRCW0603100RFKEA, "RES SMD 100 OHM 1% 1/10W 0603", Case Code (Imperial)=0603, Case Code (Metric)=1608, LCSC Part Number=C844917, Manufacturer="Vishay Dale", Max Operating Temperature=155°C, Max Power Dissipation=100mW, Min Operating Temperature=-55°C, Package Quantity=10, Ratings=AEC-Q200, Resistance Tolerance=1%, Resistor Type="Thick Film", Temperature Coefficient=100ppm/°C, Voltage Rating=75V, Case/Package=0603, ComponentLink1Description=https://datasheet.ciiva.com/22666/1720486-22666207.pdf?src-supplier=Element14, ComponentLink1URL=https://datasheet.ciiva.com/22666/1720486-22666207.pdf?src-supplier=Element14, ComponentLink2Description=https://datasheet.ciiva.com/26316/fld-crcw-e3-data-en-26316566.pdf?src-supplier=Distrelec, ComponentLink2URL=https://datasheet.ciiva.com/26316/fld-crcw-e3-data-en-26316566.pdf?src-supplier=Distrelec, ComponentLink3Description=https://datasheet.ciiva.com/22673/1697337-22673066.pdf?src-supplier=Element14, ComponentLink3URL=https://datasheet.ciiva.com/22673/1697337-22673066.pdf?src-supplier=Element14, ComponentLink4Description=https://datasheet.ciiva.com/2465/dcrcwe3-2465544.pdf?src-supplier=Digikey, ComponentLink4URL=https://datasheet.ciiva.com/2465/dcrcwe3-2465544.pdf?src-supplier=Digikey, ComponentLink5Description=https://datasheet.ciiva.com/2465/dcrcwe3-2465545.pdf?src-supplier=Digikey, ComponentLink5URL=https://datasheet.ciiva.com/2465/dcrcwe3-2465545.pdf?src-supplier=Digikey, ComponentLink6Description=https://datasheet.ciiva.com/2465/dcrcwe3-2465543.pdf?src-supplier=Digikey, ComponentLink6URL=https://datasheet.ciiva.com/2465/dcrcwe3-2465543.pdf?src-supplier=Digikey, ComponentLink7Description=https://datasheet.ciiva.com/16721/70201119-16721486.pdf?src-supplier=Allied+Electronics, ComponentLink7URL=https://datasheet.ciiva.com/16721/70201119-16721486.pdf?src-supplier=Allied+Electronics, ComponentLink8Description=https://datasheet.ciiva.com/16787/70201119-16787964.pdf?src-supplier=Allied+Electronics, ComponentLink8URL=https://datasheet.ciiva.com/16787/70201119-16787964.pdf?src-supplier=Allied+Electronics, ComponentLink9Description=https://datasheet.ciiva.com/5550/dcrcwe3-109170-5550286.pdf?src-supplier=Mouser, ComponentLink9URL=https://datasheet.ciiva.com/5550/dcrcwe3-109170-5550286.pdf?src-supplier=Mouser, ComponentLink10Description=https://datasheet.ciiva.com/16199/dcrcwe3-16199102.pdf?src-supplier=Future+Electronics, ComponentLink10URL=https://datasheet.ciiva.com/16199/dcrcwe3-16199102.pdf?src-supplier=Future+Electronics, Construction=Rectangular, Depth=0.85mm, Features="Automotive AEC-Q200", Height=0.02inch, Item Type=Resistors, Lead Free=5697LeadFree, Length=1.55mm, Manufacturer Part Number=CRCW0603100RFKEA, Military Standard=Not, Number of Terminations=2, Packaging="Tape and Reel", Pins=2NUMBER, Power Rating=100mW, Pricing="1=0.1, 10=0.017, 50=0.017, 100=0.01, 1000=0.008, 10000=0.004 (USD)", Reach SVHC Compliant=Unknown, RoHS=Yes, RoHS Compliant=Yes, Series=CRCW, Stock=584918, Supplier=Mouser, Termination=SMD/SMT, Tolerance=1%, Voltage Rating (DC)=75V, Weight=7.1E-05oz, Width=0.033inch
R?: library part RT0402BRD0721KL, "RES SMD 21K OHM 0.1% 1/16W 0402", Case Code (Imperial)=0402, Case Code (Metric)=1005, LCSC Part Number=C852638, Manufacturer=Yageo, Max Operating Temperature=155°C, Max Power Dissipation=63mW, Min Operating Temperature=-55°C, Package Quantity=10000, Power Rating=62.5mW, Supplier Part Number=8165118, Temperature Coefficient=25ppm/°C, Tolerance=0.1%, Voltage Rating=50V, Case/Package=0402, Category="Chip SMD Resistors", ComponentLink1Description=https://datasheet.ciiva.com/2582/pyu-rt-1-to-0-05-rohs-l-4-2582229.pdf?src-supplier=Digikey, ComponentLink1URL=https://datasheet.ciiva.com/2582/pyu-rt-1-to-0-05-rohs-l-4-2582229.pdf?src-supplier=Digikey, ComponentLink2Description=https://datasheet.ciiva.com/46635/pyu-rt-1-to-0-05-rohs-l-5-46635166.pdf?src-supplier=Digikey, ComponentLink2URL=https://datasheet.ciiva.com/46635/pyu-rt-1-to-0-05-rohs-l-5-46635166.pdf?src-supplier=Digikey, Features="Moisture Resistant", Height=0.014inch, Item Type=Resistor, Lead Free="Lead Free", Length=0.039inch, Manufacturer Part Number=RT0402BRD0721KL, Number of Terminations=2, Packaging="Tape and Reel", Pricing="10000=0.0236, 20000=0.0231, 40000=0.0226, 50000=0.0224, 150000=0.0214 (USD)", RoHS=Yes, RoHS Compliant=Yes, Series=RT, Stock=10000, Supplier="Future Electronics", Termination=SMD/SMT, Voltage Rating (DC)=50V, Width=0.02inch
SW1 SW2: "Without bracket 50mA 4mm 100000 Times 12V 160gf 3mm 2mm Round Button Standing paste SPST SMD Tactile Switches ROHS", LCSC Part Number=C720477, Manufacturer=XUNPU, Package=SMD, ComponentLink1Description=LCSC, ComponentLink1URL=https://www.lcsc.com/product-detail/Tactile-Switches_XUNPU-TS-1088-AR02016_C720477.html?s_z=n_TS-1088-AR02016, Item Type="Tactile Switch", Manufacturer Part Number=TS-1088-AR02016
TP2 TP4 TP?: "Test pad"
TP3: "Test Point ON", Item Type="Test Point", Manufacturer Part Number="TEST POINT 0.5mm Dia"
U2: "SOT-23-5 Linear Voltage Regulators (LDO) ROHS", LCSC Part Number=C3021084, Manufacturer="TECH PUBLIC", Package=SOT-23-5, ComponentLink1Description=LCSC, ComponentLink1URL=https://www.lcsc.com/product-detail/Linear-Voltage-Regulators-LDO_TECH-PUBLIC-XC6210B332MR_C3021084.html, Item Type=IC, Manufacturer Part Number=XC6210B332MR
U3: "SMD,12.5x13.2mm WiFi Modules ROHS", LCSC Part Number=C3013922, Manufacturer="Espressif Systems", Package=SMD,12.5x13.2mm, Item Type=IC, Manufacturer Part Number=ESP32-C3-MINI-1U-H4
U4: "INEMO 3D ACCELEROMETER AND 3D GY", LCSC Part Number=C5267406, Manufacturer=STMicroelectronics, Max Operating Temperature=85°C, Max Supply Voltage=3.6V, Min Operating Temperature=-40°C, Min Supply Voltage=1.71V, Height=860um, Item Type=IC, Manufacturer Part Number=LSM6DSV16XTR, Pricing="5000=2.815 (USD)", RoHS=No, Stock=5000, Supplier="Arrow Electronics"
U?: "Bluetooth Modules ROHS", LCSC Part Number=C356849, Manufacturer="Chengdu Ebyte Elec Tech", Package=Custom, ComponentLink1Description=LCSC, ComponentLink1URL=https://www.lcsc.com/product-detail/Bluetooth-Modules_Chengdu-Ebyte-Elec-Tech-E73-2G4M08S1C_C356849.html?s_z=n_E73-2G4M08S1C, Item Type=Module, Manufacturer Part Number=E73-2G4M08S1C
U?: "IC BAT CHG LI-ION 1 CELL SOT23-6", Battery Pack Voltage=4.2V, Case/Package=SOT-23-6, LCSC Part Number=C202311, Manufacturer="Texas Instruments", Max Charge Current=800mA, Max Operating Temperature=125°C, Max Supply Voltage=6.45V, Min Operating Temperature=0°C, Supplier Part Number 1=296-47315-1-ND, ComponentLink1Description=http://www.ti.com/lit/ds/symlink/bq21040.pdf?src-supplier=Digi-Key, ComponentLink1URL=http://www.ti.com/lit/ds/symlink/bq21040.pdf?src-supplier=Digi-Key, ComponentLink2Description=http://www.ti.com/general/docs/suppproductinfo.tsp?distId=10&gotoUrl=http%3A%2F%2Fwww.ti.com%2Flit%2Fgpn%2Fbq21040&src-supplier=Digi-Key, ComponentLink2URL=http://www.ti.com/general/docs/suppproductinfo.tsp?distId=10&gotoUrl=http%3A%2F%2Fwww.ti.com%2Flit%2Fgpn%2Fbq21040&src-supplier=Digi-Key, ComponentLink3Description=http://www.ti.com/general/docs/suppproductinfo.tsp?distId=10&amp;gotoUrl=http%3A%2F%2Fwww.ti.com%2Flit%2Fgpn%2Fbq21040&src-supplier=Digi-Key, ComponentLink3URL=http://www.ti.com/general/docs/suppproductinfo.tsp?distId=10&amp;gotoUrl=http%3A%2F%2Fwww.ti.com%2Flit%2Fgpn%2Fbq21040&src-supplier=Digi-Key, Differential Output=No, Fault Protection="Over Voltage,Over Temperature,Short Circuit", Interface=USB,SPI, Item Type=IC, Lead Free="Lead Free", Manufacturer Part Number=BQ21040DBVR, Mount="Surface Mount", Number of Bits=16, Number of Cells=1, Number of D/A Converters=4, Output Type="Analog Current/Voltage", Packaging="Cut Tape", Pricing 1="1=1.14, 10=1.015, 100=0.7396, 500=0.61924, 1000=0.48163 (USD)", Settling Time=30us, Stock 1=5958, Supplier 1=Digi-Key

## Nets (pads, with @x,y where several pads share a name; then routed paths per layer and width w, separated by ;. In a path a pad name is that pad's centre, name@x,y a point inside that pad or via, vN(x,y) a via of type N, cw(c..) or ccw(c..) an arc to the next point about the centre after c; other vN are vias at no path point)
3V3: C4.2 C5.2 C7.2 C8.1 C13.1 C14.1 LED1.2 R3.2 R4.2 R5.2 R6.2 R13.2 R14.1 TP3.1 U2.5 U3.3 U4.5 U4.8
+5: D1.1 TP2.1
BOOT: C12.2 R13.1 SW2.2 U3.23
CHRG_IND: LED?.2@1773.43,4731.93 U?.3@3151.85,4670
GND: C3.1 C4.1 C5.1 C6.1 C7.1 C8.2 C9.1 C10.1 C11.1 C12.1 C13.2 C14.2 C?.1@2559.93,4752.4 C?.2@2996.93,4752.4 C?.2@3386.93,4752.4 J1.A1/B12 J1.B1/A12 J1.S1 J1.S2 J1.S3 J1.S4 LED1.4 R2.1 R8.1 R11.1 R12.1 R?.1@2219.93,4752.4 R?.2@2426.93,4752.4 SW1.1 SW2.1 TP4.1 U2.2 U3.1 U3.2 U3.11 U3.36 U3.37 U3.38 U3.39 U3.40 U3.41 U3.42 U3.43 U3.44 U3.45 U3.46 U3.47 U3.48 U3.49 U3.50 U3.51 U3.52 U3.53 U4.1 U4.2 U4.3 U4.6 U4.7 U?.5@3255,4707.4
INT1: R14.2 U3.18 U4.4
IO5: R7.1 R8.2 U3.19
IO6: LED1.1 U3.20
IO8: R4.1 U3.22
NetC3_2: C3.2 D2.2 Q1.2 U2.1 U2.3
NetJ1_A5: J1.A5 R11.2
NetJ1_A6: J1.A6 J1.B6 R10.1
NetJ1_A7: J1.A7 J1.B7 R9.1
NetJ1_B5: J1.B5 R12.2
NetLED?_1: LED?.1@1773.43,4672.87 R?.2@2118.43,4747.4
NetR?_1: R?.1@2389.93,4752.4 U?.1@3151.85,4744.8
NetR?_2: R?.2@2256.93,4752.4 U?.4@3255,4670
RESET: C6.2 R3.1 SW1.2 U3.8
RXD: U3.31
SCL: R5.1 U4.13
SDA: R6.1 U4.14 U?.22
TXD: U3.30
USB_D_N: C11.2 R9.2 U3.26
USB_D_P: C10.2 R10.2 U3.27
VBATT: C?.2@2596.93,4752.4 Q1.3 R7.2 TP?.1 U?.2@3151.85,4707.4
VBUS: C9.2 C?.1@2959.93,4752.4 C?.1@3349.93,4752.4 D1.2 D2.1 J1.A4/B9 J1.B4/A9 Q1.1 R2.2 R?.1@2058.43,4747.4 U?.6@3255,4744.8
pads on no net: J1.A8 J1.B8 J1.MH LED1.3 LED?.1@4201.97,4767.56 LED?.1@4665.12,4672.87 LED?.2@4198.03,4748.86 LED?.2@4625.75,4657.13 LED?.3 LED?.4 U2.4 U3.4 U3.5 U3.6 U3.7 U3.9 U3.10 U3.12 U3.13 U3.14 U3.15 U3.16 U3.17 U3.21 U3.24 U3.25 U3.28 U3.29 U3.32 U3.33 U3.34 U3.35 U3.54 U3.55 U3.56 U3.57 U3.58 U3.59 U3.60 U3.61 U4.9 U4.10 U4.11 U4.12 U?.1@4793.9,2246.18 U?.2@4793.9,2196.18 U?.3@4794.09,2147.16 U?.4@4793.9,2096.18 U?.5@4793.9,2046.18 U?.6@4793.9,1996.18 U?.7 U?.8 U?.9 U?.10 U?.11 U?.12 U?.13 U?.14 U?.15 U?.16 U?.17 U?.18 U?.19 U?.20 U?.21 U?.23 U?.24 U?.25 U?.26 U?.27 U?.28 U?.29 U?.30 U?.31 U?.32 U?.33 U?.34 U?.35 U?.36 U?.37 U?.38 U?.39 U?.40 U?.41 U?.42 U?.43

## Text inside footprints (layer, text, board x,y; h text height)
J1: Mechanical 13 "PCB Edge" at 4172.31,2831.94 h31.5
LED1: Top Overlay "-" at 3719.32,4650.43 h19.68 r90; Top Overlay "+" at 3719.32,4570.43 h19.68 r90